# Altium PCB HX PZ2.0-1X10P ZZ.pcbdoc
Units mm, origin at the board's own origin, x right, y up, seen from the top; angles counter-clockwise.
Board outline 32.76 x 14.76 mm, 2 copper layers (Top Layer, Bottom Layer), stack 0 mm thick; 1 components, 0 nets, 10 pads, 0 vias.
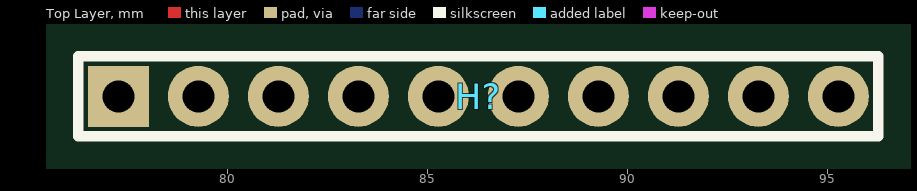
[diagram p0: Top Layer view]
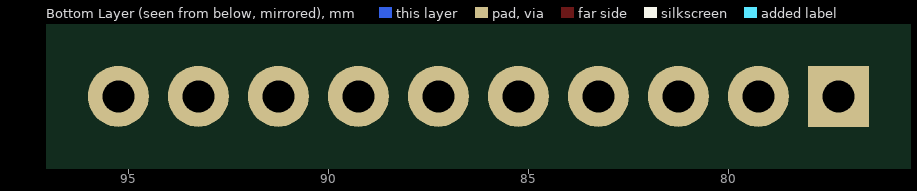
[diagram p1: Bottom Layer view, seen from below]

## Layer stack, top to bottom
Top Layer: signal copper (thickness not stored)
Bottom Layer: signal copper (thickness not stored)

## Board outline
102.61,69.85 69.85,69.85 69.85,84.61 102.61,84.61

## Design rules (kind name [scope] priority, off if disabled: settings)
PasteMaskExpansion "Paste Mask Expansion" [All] p1: expansion=0
SolderMaskExpansion "Solder Mask Expansion" [IsVia] p1: expansion=-25.4 istentingtop=TRUE
SolderMaskExpansion "Solder Mask Expansion" [All] p2: expansion=0.051 istentingtop=FALSE

## Components (designator, comment, footprint, x,y, rotation, side; value= is the part's Value field where it differs from the comment)
H? "HX PZ2.0-1x10P ZZ" HDR-TH_10P-P2.00-V-M-1 86.26,77.26 r0 top

## Footprints (in the part's own frame and the unit in brackets; to place one, negate y for a bottom-side part, rotate by r counter-clockwise, add the part's x,y. Pads: shape width x height; smd on the part's side, far side on the other; paste and mask are expansions set on the pad)
HDR-TH_10P-P2.00-V-M-1 [mil]
  rect 60x60 hole 31.5: 1(-354.33,0)
  round 60 hole 31.5: 2(-275.59,0) 3(-196.85,0) 4(-118.11,0) 5(-39.37,0) 6(39.37,0) 7(118.11,0) 8(196.85,0) 9(275.59,0) 10(354.33,0)
  silkscreen extent -394,-39 394,39

## Nets (pads, with @x,y where several pads share a name; then routed paths per layer and width w, separated by ;. In a path a pad name is that pad's centre, name@x,y a point inside that pad or via, vN(x,y) a via of type N, cw(c..) or ccw(c..) an arc to the next point about the centre after c; other vN are vias at no path point)
pads on no net: H?.1 H?.2 H?.3 H?.4 H?.5 H?.6 H?.7 H?.8 H?.9 H?.10